# Altium PCB Solar.PcbDoc (part 1 of 2)
Units mm, origin at the board's own origin, x right, y up, seen from the top; angles counter-clockwise.
Board outline 89.66 x 101.6 mm, 2 copper layers (Top Layer, Bottom Layer); 143 components, 89 nets, 454 pads, 227 vias.
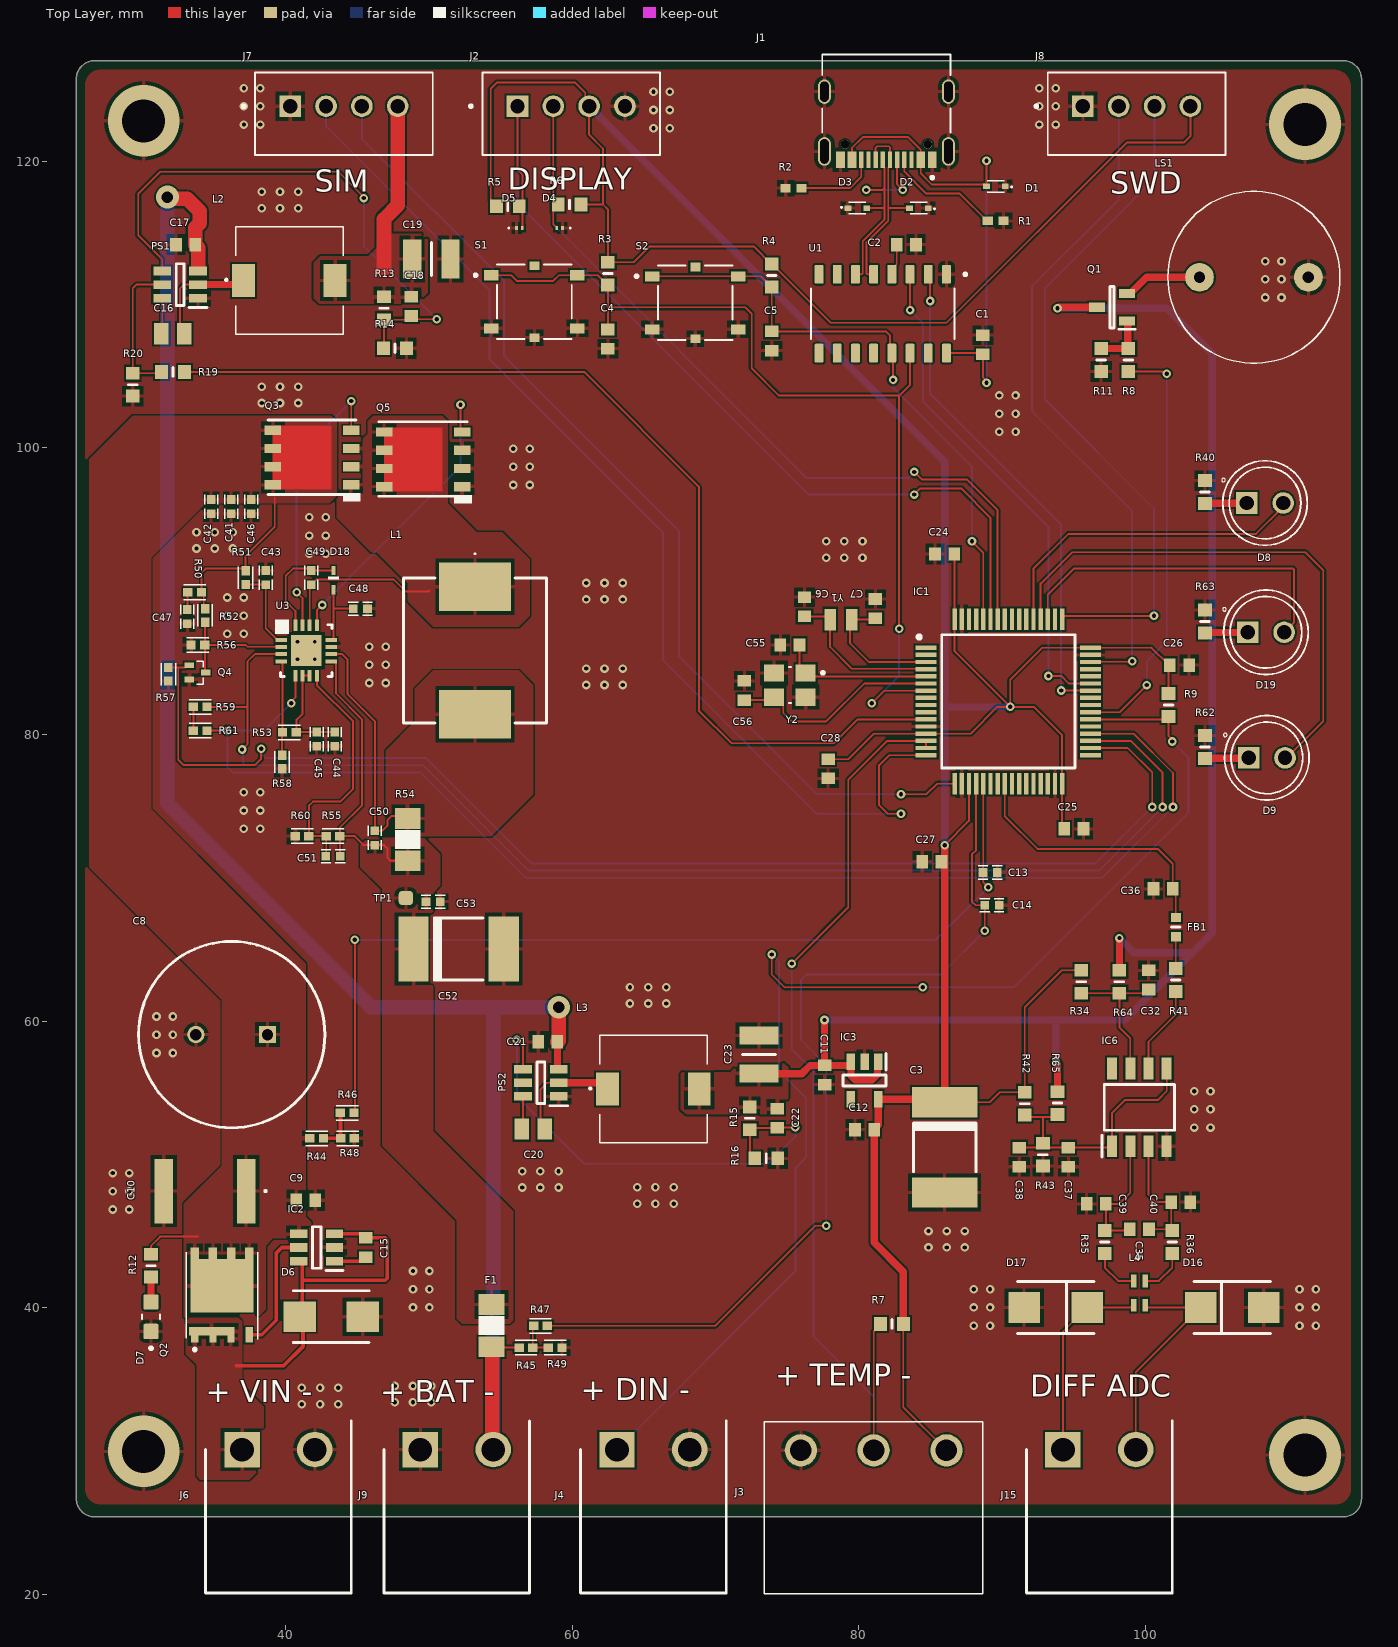
[diagram p0: Top Layer view]
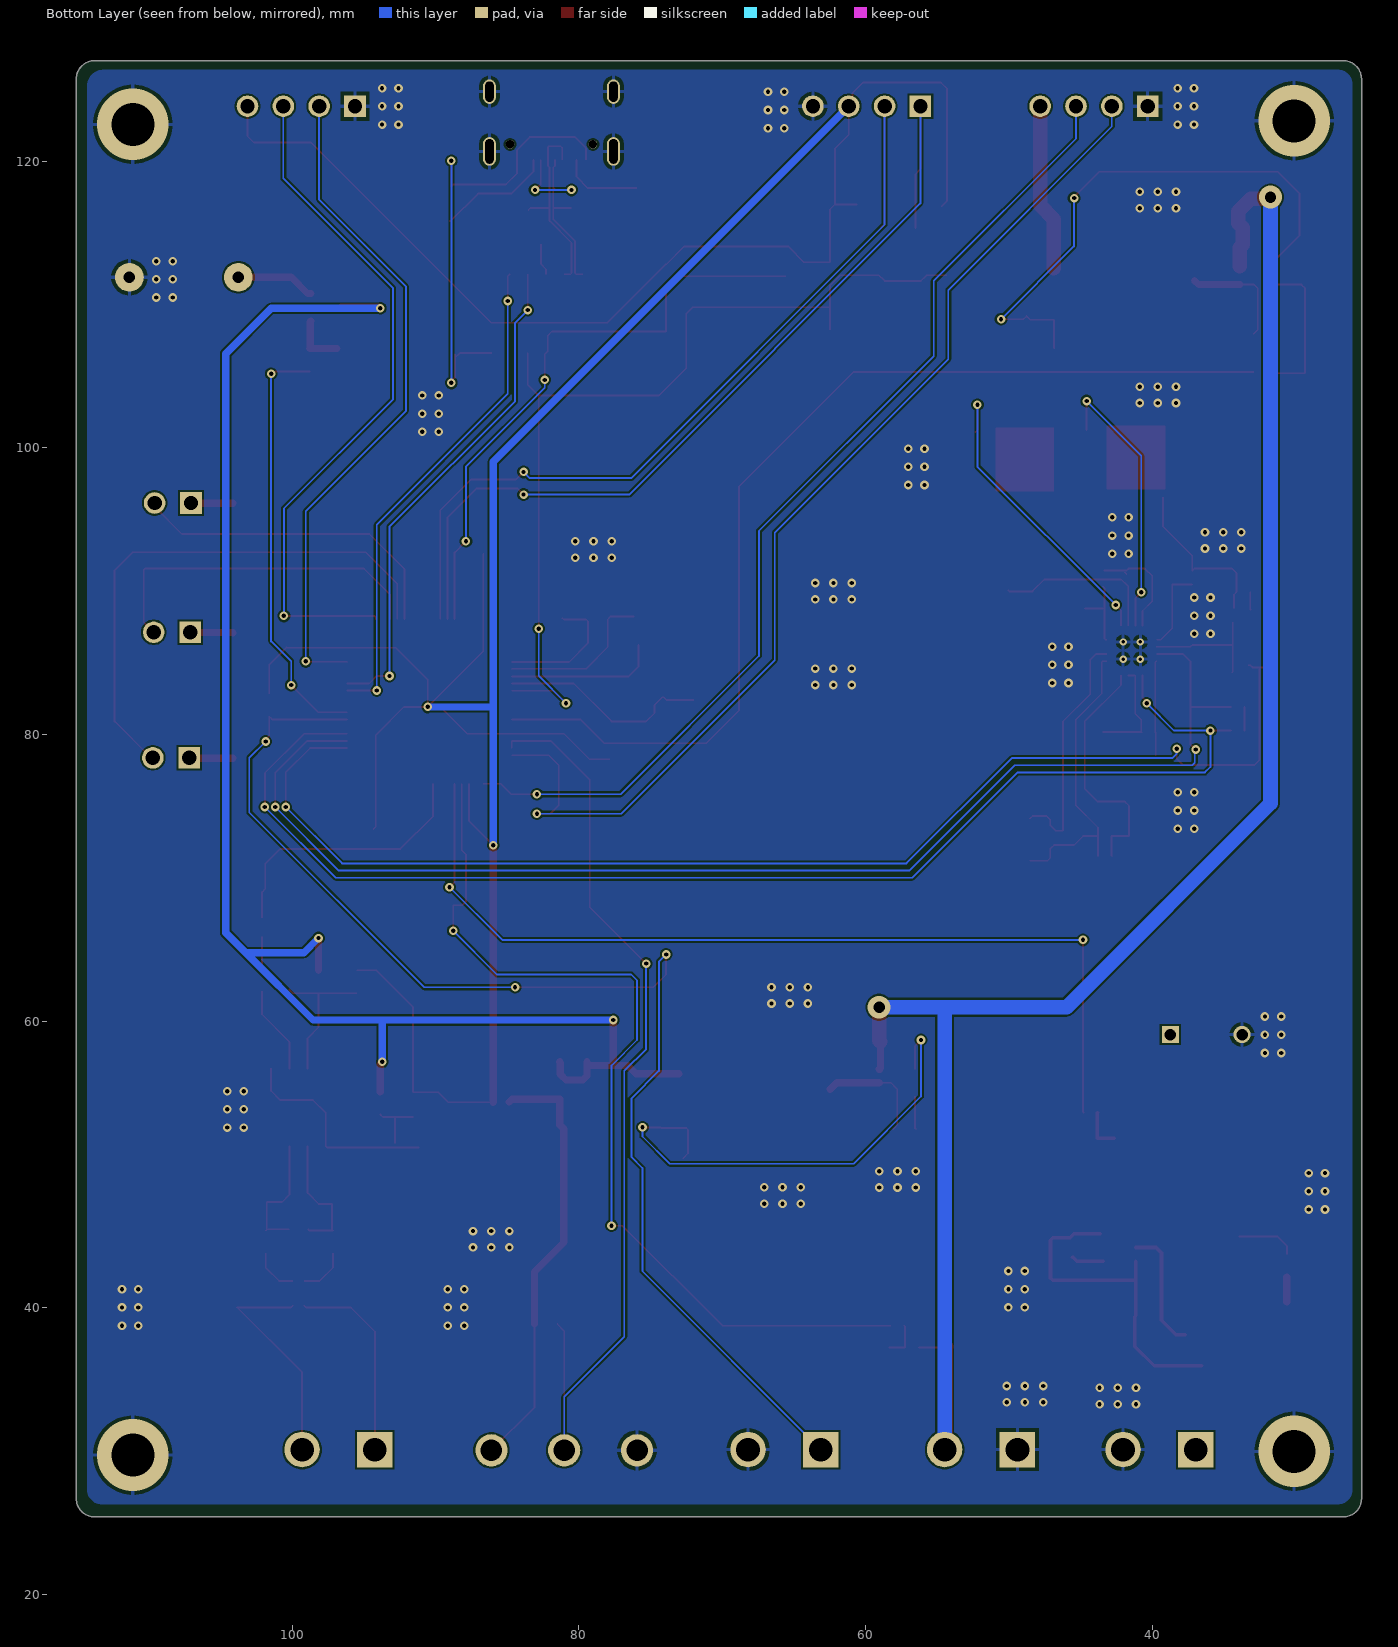
[diagram p1: Bottom Layer view, seen from below]
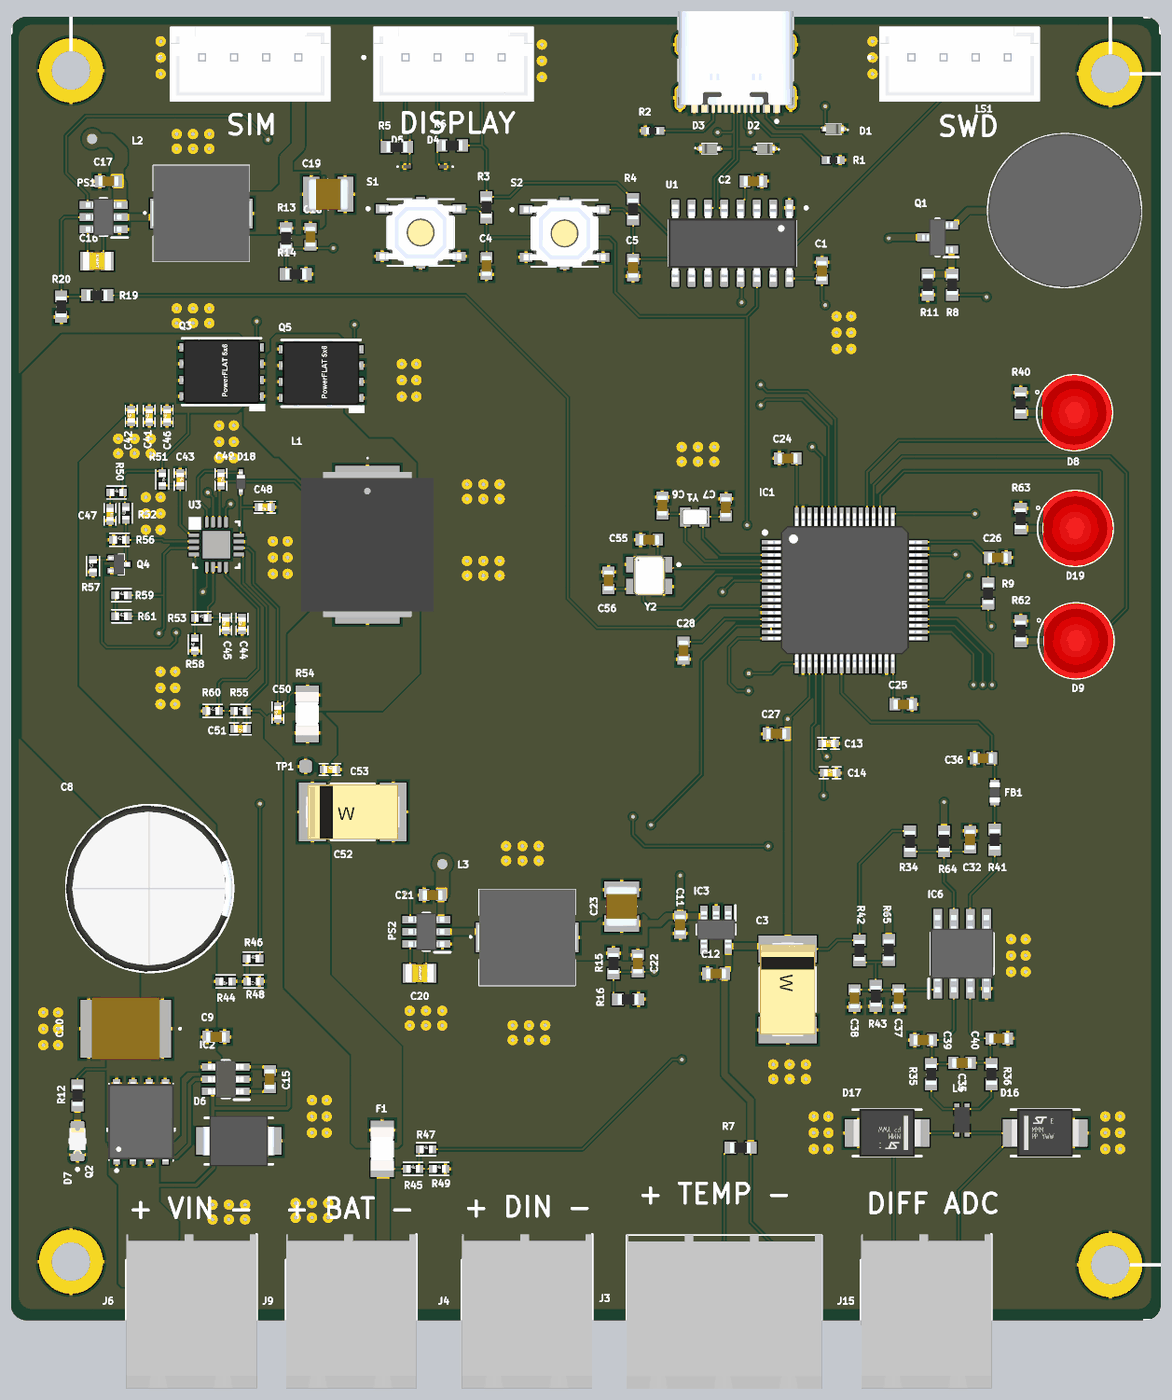
[diagram p3: 3D render of the assembled board from above, using the file's embedded part models]

## Layer stack, top to bottom
Top Solder: solder mask 0.0102, Solder Resist, Dk 3.5
Top Layer: signal copper 0.0356
Dielectric 1: dielectric 0.32, FR-4, Dk 4.8
Bottom Layer: signal copper 0.0356
Bottom Solder: solder mask 0.0102, Solder Resist, Dk 3.5

## Board outline
25.4,26.67 25.4,125.73 cw(c26.67,125.73) 26.67,127 113.792,127 cw(c113.792,125.73) 115.062,125.73 115.062,26.67 cw(c113.792,26.67) 113.792,25.4 26.67,25.4 cw(c26.67,26.67)

## Design rules (kind name [scope] priority, off if disabled: settings)
Clearance [All] p1: gap=0.127 ignorepadtopadclearanceinfootprint=TRUE
DiffPairsRouting [All] p1: maxlimit=0.127 minlimit=0.127 mostfreqgap=0.127 toplayer_minwidth=0.127 toplayer_maxwidth=0.279 toplayer_prefwidth=0.127 bottomlayer_minwidth=0.127 bottomlayer_maxwidth=0.279 bottomlayer_prefwidth=0.127 maxuncoupledlength=12.7
HoleSize [All] p1: absolutevalues=TRUE maxlimit=6 minlimit=0.025 maxpercent=80.000 minpercent=20.000
PolygonConnect [All] p1: connectstyle=Relief reliefconductorwidth=0.254 reliefentries=4 polygonreliefangle="90 Angle" airgapwidth=0.254
RoutingVias [All] p1: holewidth=0.3 width=0.6 viastyle="Through Hole" minholewidth=0.3 minwidth=0.6 maxholewidth=6 maxwidth=12
SilkToSolderMaskClearance [IsPad] p1: minsilkscreentomaskgap=0.127 clearancetoexposedcopper=TRUE
SolderMaskExpansion [All] p1: expansion=0.102 istentingtop=FALSE
Width [All] p1: maxlimit=2.54 minlimit=0.127 preferedwidth=0.254
27 further rules are at their usual default settings.

## Classes and differential pairs
component class PWR: C8 C9 C10 C11 C12 C15 C16 C17 C18 C19 C20 C21 C22 C23 D6 D7 IC2 IC3 J6 L2 L3 PS1 PS2 Q2 R12 R13 R14 R15 R16 R19 R20
component class programmer: C1 C2 D1 D2 D3 J1 R1 R2 U1
component class MCU: C3 C4 C5 C6 C7 C24 C25 C26 C27 C28 C55 C56 D4 D5 D8 D9 D19 IC1 J2 J3 J4 J8 LS1 Q1 R3 R4 R5 R6 R7 R8 R9 R11 R40 R62 R63 S1 S2 Y1 Y2
component class GSM: J7
component class Charger: C41 C42 C43 C44 C45 C46 C47 C48 C49 C50 C51 C52 C53 D18 F1 J9 L1 Q3 Q4 Q5 R50 R51 R52 R53 R54 R55 R56 R57 R58 R59 R60 R61 TP1 U3
component class ADC: C13 C14 C32 C35 C36 C37 C38 C39 C40 D16 D17 FB1 IC6 J15 L4 R34 R35 R36 R41 R42 R43 R44 R45 R46 R47 R48 R49 R64 R65
differential pair USB: +USB_P -USB_N

## Components (designator, comment, footprint, x,y, rotation, side; value= is the part's Value field where it differs from the comment)
C1 "0.1 uF" CAP0603 88.646,107.188 r270 top
C2 "0.1 uF" CAP0603 83.312,114.173 r180 top
C3 "Capacitor Tantalum" EIA-7343-31 85.979,51.181 r270 top value=47uF
C4 "0.1 uF" CAP0603 62.489,107.579 r270 top
C5 "0.1 uF" CAP0603 73.919,107.442 r270 top
C6 "1.5 pF" CAP0603 76.2,88.9 r270 top
C7 "1.5 pF" CAP0603 81.153,88.773 r270 top
C8 "MAL213651471E3" CAPPRD500W60D1300H2700 38.735,59.055 r180 top
C9 "2.2 uF" CAP0603 41.402,47.498 r180 top
C10 "C5750X5R1H106K230KA" C5750_Commercial 34.371,48.133 r180 top
C11 "2.2 uF" CAP0603 77.597,56.231 r270 top
C12 "2.2 uF" CAP0603 80.391,52.421 r180 top
C13 "Capacitor ceramic" C0402 89.154,70.358 r0 top value=100nF
C14 "Capacitor ceramic" C0402 89.281,68.072 r0 top value=100nF
C15 "0.1 uF" CAP0603 45.593,44.196 r270 top
C16 "C0805C104M5RAC-TU" CAPC2012X88N 32.131,107.95 r180 top
C17 "C5750X5R1H106K230KA" CAP0603 33.02,114.173 r0 top
C18 "GRM0335C1E560JA01D" CAP0603 48.768,109.855 r90 top
C19 "GRM32ER61C476KE15L" CAPC3225X270N 50.165,113.157 r180 top
C20 "C0805C104M5RAC-TU" CAPC2012X88N 57.277,52.451 r180 top
C21 "C5750X5R1H106K230KA" CAP0603 58.293,58.547 r0 top
C22 "CGA1A2C0G1E820J030BA" CAP0603 74.295,53.213 r90 top
C23 "GRM32ER61C476KE15L" CAPC3225X270N 73.025,57.658 r270 top
C24 "0.1 uF" CAP0603 85.979,92.583 r180 top
C25 "0.1 uF" CAP0603 94.996,73.406 r0 top
C26 "0.1 uF" CAP0603 102.362,84.836 r0 top
C27 "0.1 uF" CAP0603 85.09,71.12 r180 top
C28 "0.1 uF" CAP0603 77.851,77.597 r270 top
C32 "0.1 uF" CAP0603 100.203,62.865 r90 top
C35 "0.1 uF" CAP0603 99.568,45.466 r0 top
C36 "10 nF" CAP0603 101.219,69.215 r180 top
C37 "10 uF" CAP0603 94.615,50.498 r270 top
C38 "0.1 uF" CAP0603 91.186,50.498 r270 top
C39 "0.1 uF" CAP0603 96.555,47.244 r0 top
C40 "0.1 uF" CAP0603 102.454,47.371 r0 top
C41 "Capacitor ceramic" C0402 36.195,95.885 r90 top value=100nF
C42 "Capacitor ceramic" C0402 34.798,95.885 r90 top value=100nF
C43 "Capacitor ceramic" C0402 38.608,90.932 r270 top value=100nF
C44 "Capacitor ceramic" C0402 43.434,79.666 r90 top value=100nF
C45 "Capacitor ceramic" C0402 42.164,79.666 r90 top value=100nF
C46 "Capacitor ceramic" C0402 37.592,95.885 r90 top value=100nF
C47 "Capacitor ceramic" C0402 33.147,88.212 r270 top value=100nF
C48 "Capacitor ceramic" C0402 45.212,88.773 r180 top value=100nF
C49 "Capacitor ceramic" C0402 41.783,90.932 r270 top value=100nF
C50 "Capacitor ceramic" C0402 46.228,72.771 r90 top value=100nF
C51 "Capacitor ceramic" C0402 43.307,71.501 r180 top value=100nF
C52 "Capacitor Tantalum" EIA-7343-31 52.07,65.024 r0 top value=47uF
C53 "Capacitor ceramic" C0402 50.292,68.326 r0 top value=100nF
C55 "1.5 pF" CAP0603 75.184,86.233 r0 top
C56 "1.5 pF" CAP0603 72.009,83.058 r270 top
D1 "LESD5D5.0CT1G" LESD5D50CT1G 89.546,118.237 r180 top
D2 "LESD5D5.0CT1G" LESD5D50CT1G 84.176,116.713 r180 top
D3 "LESD5D5.0CT1G" LESD5D50CT1G 79.883,116.713 r0 top
D4 "DESD3V3Z1BCSF-7" DESD3V3Z1BCSF7 59.109,115.316 r180 top
D5 "DESD3V3Z1BCSF-7" DESD3V3Z1BCSF7 56.315,115.316 r0 top
D6 "SMBJ24CA-13-F" DIONM5336X250N 43.18,39.37 r0 top
D7 "LED_SMD" LEDSC125X200X90-2N 30.607,39.37 r90 top
D8 "WP7113ID" LED_WP7113ID 108.331,96.139 r0 top
D9 "WP7113ID" LED_WP7113ID 108.458,78.359 r0 top
D16 "SMBJ5.0A" SMBJ12A 106.045,40.005 r0 top
D17 "SMBJ5.0A" SMBJ12A 93.726,40.005 r180 top
D18 "BAT54KFILM" SOD-523 43.339,90.755 r90 top
D19 "WP7113ID" LED_WP7113ID 108.394,87.122 r0 top
F1 "10A, 24V" F1206 54.356,38.735 r270 top value=1206SFH100F/24-2
FB1 "BLM18PG121SN1D" BLM18SP221SN1B 102.108,66.548 r90 top
IC1 "STM32F103RET6" QFP50P1200X1200X160-64N 90.424,82.296 r0 top
IC2 "LM74700QDBVTQ1" SOT95P280X145-6N 42.164,44.196 r180 top
IC3 "AP2112K-1.2TRG1" SOT95P285X140-5N 80.391,55.85 r270 top
IC6 "INA149AID" SOIC127P600X175-8N 99.568,53.975 r90 top
J1 "TYPE-C-31-M-12" HRO_TYPE-C-31-M-12 81.915,124.841 r180 top
J2 "DISPLAY" JST_B4B-XH-A(LF)(SN) 59.924,123.3 r180 top
J3 "DS18B20/PT100" 2828153 75.946,30.049 r0 top
J4 "Digital" SHDRRA2W102P0X508_1X2_1016X1200X850P 63.119,30.099 r180 top
J6 "282815-2" SHDRRA2W102P0X508_1X2_1016X1200X850P 36.957,30.099 r180 top
J7 "EX_SIM" JST_B4B-XH-A(LF)(SN) 44.069,123.3 r180 top
J8 "DISPLAY" JST_B4B-XH-A(LF)(SN) 99.374,123.3 r180 top
J9 "282815-2" SHDRRA2W102P0X508_1X2_1016X1200X850P 49.403,30.099 r180 top
J15 "282815-2" SHDRRA2W102P0X508_1X2_1016X1200X850P 94.234,30.099 r180 top
L1 "SRP1038WA-6R8M" SRP1038WA6R8M 53.213,85.852 r270 top
L2 "PA4302.103NLT" PA4302103NLT 40.259,111.658 r90 top
L3 "PA4302.103NLT" PA4302103NLT 65.659,55.245 r90 top
L4 "744231091" WE-CNSW_08058 99.568,41.021 r0 top
LS1 "CMI-1295IC-0585T" CMI1295IC0585T 103.759,111.887 r0 top
PS1 "TPS54202DDCR" SOT95P280X110-6N 32.639,111.379 r180 top
PS2 "TPS54202DDCR" SOT95P280X110-6N 57.805,55.687 r180 top
Q1 "DMG3415U-7" SOT96P240X110-3N 97.655,109.799 r180 top
Q2 "BSC014N06NSATMA1" BSC010N04LS6ATMA1 35.56,40.879 r0 top
Q3 "STL150N3LLH5" "PowerFLAT 5x6" 44.566,97.409 r90 top
Q4 "DMG1012T" SOT-523_custom 33.849,84.32 r270 top value=DMG1012T-7
Q5 "STL150N3LLH5" "PowerFLAT 5x6" 52.324,97.282 r90 top
R1 "CRCW0402100KFKEDHP" RESC1005X40N 89.535,115.824 r0 top
R2 "CRCW0402100KFKEDHP" RESC1005X40N 75.438,118.11 r0 top
R3 "10K" RES0603 62.484,112.141 r90 top
R4 "10K" RES0603 73.914,112.004 r90 top
R5 "4.7K" RES0603 55.499,116.84 r180 top
R6 "4.7K" RES0603 59.817,116.967 r0 top
R7 "4.7K" RES0603 82.296,38.862 r0 top
R8 "300R" RES0603 98.798,106.116 r270 top
R9 "4.7K" RES0603 101.6,82.042 r90 top
R11 "10K" RES0603 96.893,106.116 r270 top
R12 "1K" RES0603 30.607,42.926 r270 top
R13 "CRCW0402100KFKEDHP" RES0603 46.863,109.728 r90 top
R14 "CRCW040216K9FKEDHP" RES0603 47.625,106.934 r180 top
R15 "CRCW0402100KFKEDHP" RES0603 72.39,53.213 r90 top
R16 "CRCW040213K7FKEDHP" RES0603 73.533,50.419 r180 top
R19 "300R" RES0603 32.131,105.283 r0 top
R20 "10K" RES0603 29.337,104.394 r270 top
R34 "00" RES0603 95.504,62.738 r90 top
R35 "100R" RES0603 97.155,44.577 r90 top
R36 "100R" RES0603 101.854,44.577 r90 top
R40 "300R" RES0603 104.14,96.901 r270 top
R41 "10K" RES0603 102.108,62.865 r90 top
R42 "10K" RES0603 91.567,54.229 r90 top
R43 "10K" RES0603 92.837,50.673 r90 top
R44 "Resistor" R0402 42.164,51.816 r180 top value=100K
R45 "Resistor" R0402 56.769,37.211 r0 top value=100K
R46 "Resistor" R0402 44.29,53.594 r0 top value=1K
R47 "Resistor" R0402 57.785,38.735 r0 top value=1K
R48 "Resistor" R0402 44.323,51.816 r180 top value=12K
R49 "Resistor" R0402 58.801,37.211 r0 top value=24.9K
R50 "Resistor" R0402 33.655,89.916 r0 top value=100K
R51 "Resistor" R0402 37.211,90.932 r270 top value=100K
R52 "Resistor" R0402 34.38,88.298 r90 top value=150K
R53 "Resistor" R0402 40.259,80.137 r0 top value=100K
R54 "Resistor" F1206 48.514,72.644 r270 top value=100K
R55 "Resistor" R0402 43.307,72.898 r0 top value=560K
R56 "Resistor" R0402 33.876,86.233 r0 top value=11K
R57 "Resistor" R0402 31.817,84.193 r90 top value=10K
R58 "Resistor" R0402 39.751,78.072 r90 top value=100K
R59 "Resistor" R0402 34.036,81.915 r0 top value=100K
R60 "Resistor" R0402 41.148,72.898 r0 top value=110K
R61 "Resistor" R0402 34.036,80.264 r0 top value=100K
R62 "300R" RES0603 104.14,79.121 r270 top
R63 "300R" RES0603 104.14,87.884 r270 top
R64 "00" RES0603 98.171,62.738 r90 top
R65 "10K" RES0603 93.853,54.267 r90 top
S1 "PTS526_SMG15_SMTR2_LFS" SW_PTS526_SMG15_SMTR2_LFS 57.356,110.181 r0 top
S2 "PTS526_SMG15_SMTR2_LFS" SW_PTS526_SMG15_SMTR2_LFS 68.58,110.109 r0 top
TP1 "Test_Point" TEST_POINT 48.387,68.58 r90 top
U1 "CH340C" SOIC127P600X180-16N 81.661,109.347 r270 top
U3 "BQ24650" QFN-16_custom 41.43,85.848 r0 top value=BQ24650RVAT
Y1 "CM8V-T1A-32.768KHZ-6PF-20PPM-TA-QC" XTAL_CM8V-T1A-32.768KHZ-6PF-20PPM-TA-QC 78.74,88.011 r180 top
Y2 "C3E-25.000-8-1530-X-R" XTAL_C3E-25.000-8-1530-X-R 75.184,83.439 r180 top

## Footprints (in the part's own frame and the unit in brackets; to place one, negate y for a bottom-side part, rotate by r counter-clockwise, add the part's x,y. Pads: shape width x height; smd on the part's side, far side on the other; paste and mask are expansions set on the pad)
2828153 [mm]
  round 2.25 hole 1.5: 1(0,0) 2(5.08,0) 3(10.16,0)
  silkscreen extent -2.54,-10 12.7,2, body extent -2.54,-10 12.7,2, height 8.46
BLM18SP221SN1B [mm]
  rect 0.65x0.7 smd: 1(-0.675,0) 2(0.675,0)
  silkscreen extent 0,-0.3 0,0.3, body extent -0.8,-0.4 0.8,0.4, height 0.8
BSC010N04LS6ATMA1 [mm]
  rect 0.5x0.5 smd: 1(-1.905,-3.075) 2(-0.635,-3.075) 3(0.635,-3.075)
  rect 0.5x1.1 smd: 4(1.905,-2.775)
  rect 0.6x0.8 smd: 5(1.905,2.925) 6(0.635,2.925) 7(-0.635,2.925) 8(-1.905,2.925)
  rect 4.41x3.75 smd: 9(0,0.65)
  rect 3.2x0.6 smd: 10(-0.715,-2.525)
  silkscreen extent -2.5,-3.9 2.5,3, body extent -2.7,-3.08 2.7,3.08, height 1.1
C0402 [mm]
  rect 0.6x0.6 smd: 1(-0.5,0) 2(0.5,0)
  silkscreen extent -0.84,-0.46 0.84,0.46, body extent -0.5,-0.3 0.5,0.3, height 0.2
C5750_Commercial [mm]
  rect 1.3x4.5 smd: 1(-2.875,0) 2(2.875,0)
  silkscreen extent -4.28,-0.05 -4.18,0.05, body extent -2.65,-2.45 2.65,2.45, height 2.77
CAP0603 [mm]
  rect 0.81x0.94 smd: 1(-0.67,0) 2(0.67,0)
  body extent -0.8,-0.4 0.8,0.4, height 0.9
CAPC2012X88N [mm]
  rect 1.02x1.47 smd: 1(-0.8,0) 2(0.8,0)
  body extent -1.1,-0.73 1.1,0.72, height 0.88
CAPC3225X270N [mm]
  rect 1.26x2.72 smd: 1(-1.33,0) 2(1.33,0)
  silkscreen extent 0,-1.15 0,1.15, body extent -1.6,-1.25 1.6,1.25, height 2.7
CAPPRD500W60D1300H2700 [mm]
  rect 1.2x1.2 hole 0.8: 1(0,0)
  round 1.2 hole 0.8: 2(5,0)
  silkscreen extent -4,-6.5 9,6.5, body extent -3.96,-6.49 9.03,6.49, height 25
CMI1295IC0585T [mm]
  round 2 hole 0.8: 1(0,0) 2(7.6,0)
  silkscreen extent -2.2,-6 9.8,6, body extent -2.19,-5.99 9.81,6, height 9.63
DESD3V3Z1BCSF7 [mm]
  rect 0.194x0.291 smd: 1(-0.2,0) 2(0.2,0)
  silkscreen extent -0.8,-0.05 -0.7,0.05, body extent -0.3,-0.15 0.3,0.15, height 0.42
DIONM5336X250N [mm]
  rect 2.25x2.15 smd: 1(-2.2,0) 2(2.2,0)
  silkscreen extent -2.65,-1.81 2.65,1.81, body extent -2.8,-1.97 2.8,1.97, height 2.57
EIA-7343-31 [mm]
  rect 2.1x4.55 smd: 1(-3.15,0) 2(3.15,0)
  silkscreen extent -1.7,-2.18 1.7,2.17, body extent -3.65,-2.16 3.65,2.14, height 2.3
F1206 [mm]
  rect 1.45x1.8 smd: 1(-1.488,0.005) 2(1.462,0.005)
  silkscreen extent -0.67,-0.9 0.65,0.91, body extent -1.73,-0.9 1.67,0.9, height 1.17
HRO_TYPE-C-31-M-12 [mm]
  rect 0.6x1.14 smd mask+0.05: A1_B12(-3.2,4.75) A4_B9(-2.4,4.75) B1_A12(3.2,4.75) B4_A9(2.4,4.75)
  rect 0.3x1.14 smd mask+0.05: A5(-1.25,4.75) A6(-0.25,4.75) A7(0.25,4.75) A8(1.25,4.75) B5(1.75,4.75) B6(0.75,4.75) B7(-0.75,4.75) B8(-1.75,4.75)
  oval 0.9x2 hole 0.6 slot 1.7 at 90 deg: S1(-4.325,4.17) S2(4.325,4.17)
  oval 0.9x1.7 hole 0.6 slot 1.4 at 90 deg: S3(-4.325,0) S4(4.325,0)
  round 0.6 hole 0.6 unplated: ""(-2.89,3.68) ""(2.89,3.68)
  silkscreen extent -4.47,-2.6 4.47,6.1, body extent -4.47,-2.6 4.47,5.31, height 3.31
JST_B4B-XH-A(LF)(SN) [mm]
  rect 1.508x1.508 / inner round 1.508 / far side rect 1.508x1.508 hole 1: 1(3.75,-0.525)
  round 1.508 hole 1: 2(1.25,-0.525) 3(-1.25,-0.525) 4(-3.75,-0.525)
  silkscreen extent -6.2,-2.88 7.1,2.88, body extent -6.2,-2.88 6.2,2.88, height 7
LED_WP7113ID [mm]
  round 1.508 hole 1: A(1.27,0)
  rect 1.508x1.508 / inner round 1.508 / far side rect 1.508x1.508 hole 1: C(-1.27,0)
  silkscreen extent -3.03,-2.95 2.95,2.95, body extent -2.5,-2.95 2.95,2.95, height 9.6
LEDSC125X200X90-2N [mm]
  rrect25% 1.07x1.08 smd: A(1.025,0) C(-1.025,0)
  silkscreen extent -2.3,-0.63 0.17,0.63, body extent -1,-0.63 1,0.63, height 0.7
LESD5D50CT1G [mm]
  rect 0.48x0.4 smd: 1(-0.66,0) 2(0.66,0)
  silkscreen extent -1.15,-0.4 0.6,0.4, body extent -0.8,-0.4 0.8,0.4, height 0.6
PA4302103NLT [mm]
  rect 2.3x1.6 smd: 1(0,3.2) 2(0,-3.2)
  silkscreen extent -3.75,-3.75 3.75,4.45, body extent -3.75,-3.84 3.75,3.84, height 5.7
"PowerFLAT 5x6" [mm]
  rect 0.65x1.15 smd: 1(0,0) 2(1.27,0) 3(2.54,0) 4(3.81,0) 5(3.81,5.45) 6(2.54,5.45) 7(1.27,5.45) 8(0,5.45)
  Top Layer region: -0.325,1.375 4.135,1.375 4.135,5.475 -0.325,5.475
  silkscreen extent -1.17,-0.67 4.53,5.8, body extent -0.67,-0.35 4.53,5.8, height 0.95
QFN-16_custom [mm]
  rect 0.8x0.28 smd: 1(-1.75,0.75) 2(-1.75,0.25) 3(-1.75,-0.25) 4(-1.75,-0.75) 9(1.75,-0.75) 10(1.75,-0.25) 11(1.75,0.25) 12(1.75,0.75)
  rect 0.28x0.8 smd: 5(-0.75,-1.75) 6(-0.25,-1.75) 7(0.25,-1.75) 8(0.75,-1.75) 13(0.75,1.75) 14(0.25,1.75) 15(-0.25,1.75) 16(-0.75,1.75)
  rect 2.14x2.14 smd: 17(0,0)
  silkscreen extent -2.16,-1.8 1.8,2.15, body extent -1.8,-1.8 1.8,1.8, height 1
QFP50P1200X1200X160-64N [mm]
  rect 1.475x0.3 smd: 1(-5.738,3.75) 2(-5.738,3.25) 3(-5.738,2.75) 4(-5.738,2.25) 5(-5.738,1.75) 6(-5.738,1.25) 7(-5.738,0.75) 8(-5.738,0.25) 9(-5.738,-0.25) 10(-5.738,-0.75) 11(-5.738,-1.25) 12(-5.738,-1.75) 13(-5.738,-2.25) 14(-5.738,-2.75) 15(-5.738,-3.25) 16(-5.738,-3.75) 33(5.738,-3.75) 34(5.738,-3.25) 35(5.738,-2.75) 36(5.738,-2.25) 37(5.738,-1.75) 38(5.738,-1.25) 39(5.738,-0.75) 40(5.738,-0.25) 41(5.738,0.25) 42(5.738,0.75) 43(5.738,1.25) 44(5.738,1.75) 45(5.738,2.25) 46(5.738,2.75) 47(5.738,3.25) 48(5.738,3.75)
  rect 0.3x1.475 smd: 17(-3.75,-5.738) 18(-3.25,-5.738) 19(-2.75,-5.738) 20(-2.25,-5.738) 21(-1.75,-5.738) 22(-1.25,-5.738) 23(-0.75,-5.738) 24(-0.25,-5.738) 25(0.25,-5.738) 26(0.75,-5.738) 27(1.25,-5.738) 28(1.75,-5.738) 29(2.25,-5.738) 30(2.75,-5.738) 31(3.25,-5.738) 32(3.75,-5.738) 49(3.75,5.738) 50(3.25,5.738) 51(2.75,5.738) 52(2.25,5.738) 53(1.75,5.738) 54(1.25,5.738) 55(0.75,5.738) 56(0.25,5.738) 57(-0.25,5.738) 58(-0.75,5.738) 59(-1.25,5.738) 60(-1.75,5.738) 61(-2.25,5.738) 62(-2.75,5.738) 63(-3.25,5.738) 64(-3.75,5.738)
  silkscreen extent -6.35,-4.65 4.65,4.65, body extent -6,-6 6,6, height 1.6
R0402 [mm]
  rect 0.65x0.6 smd: 1(-0.475,0) 2(0.475,0)
  silkscreen extent -0.76,-0.51 0.76,0.51, body extent -0.5,-0.3 0.5,0.3, height 0.2
RES0603 [mm]
  rect 0.9x0.95 smd: 1(-0.8,0) 2(0.8,0)
  silkscreen extent 0,-0.3 0,0.3, body extent -0.8,-0.4 0.8,0.4, height 0.55
RESC1005X40N [mm]
  rect 0.7x0.6 smd: 1(-0.55,0) 2(0.55,0)
  body extent -0.5,-0.25 0.5,0.25, height 0.4
SHDRRA2W102P0X508_1X2_1016X1200X850P [mm]
  rect 2.475x2.475 hole 1.65: 1(0,0)
  round 2.475 hole 1.65: 2(-5.08,0)
  silkscreen extent -7.62,-2 2.54,10, body extent -7.62,-2 2.54,10, height 8.35
SMBJ12A [mm]
  rect 2.2x2.15 smd: 1(-2.2,0) 2(2.2,0)
  silkscreen extent -2.68,-1.81 2.68,1.81, body extent -2.68,-1.86 2.68,1.86, height 2.33
SOD-523 [mm]
  rect 0.65x0.3 smd: 1(-0.675,0) 2(0.675,0)
  silkscreen extent 0.05,-0.4 0.24,0.4, body extent -0.8,-0.4 0.8,0.4, height 0.7
SOIC127P600X175-8N [mm]
  rect 1.525x0.7 smd: 1(-2.712,1.905) 2(-2.712,0.635) 3(-2.712,-0.635) 4(-2.712,-1.905) 5(2.712,-1.905) 6(2.712,-0.635) 7(2.712,0.635) 8(2.712,1.905)
  silkscreen extent -3.47,-2.45 1.6,2.61, body extent -3,-2.45 3,2.45, height 1.75
SOIC127P600X180-16N [mm]
  rrect25% 1.31x0.62 smd: 1(-2.75,4.445) 2(-2.75,3.175) 3(-2.75,1.905) 4(-2.75,0.635) 5(-2.75,-0.635) 6(-2.75,-1.905) 7(-2.75,-3.175) 8(-2.75,-4.445) 9(2.75,-4.445) 10(2.75,-3.175) 11(2.75,-1.905) 12(2.75,-0.635) 13(2.75,0.635) 14(2.75,1.905) 15(2.75,3.175) 16(2.75,4.445)
  silkscreen extent -2.85,-5 1.78,5.85, body extent -3,-5 3,5, height 1.8
SOT95P280X110-6N [mm]
  rect 1.25x0.6 smd: 1(-1.25,0.95) 2(-1.25,0) 3(-1.25,-0.95) 4(1.25,-0.95) 5(1.25,0) 6(1.25,0.95)
  silkscreen extent -1.88,-1.45 0.28,1.6, body extent -1.4,-1.45 1.4,1.45, height 1.1
SOT95P280X145-6N [mm]
  rect 1.2x0.6 smd: 1(-1.25,0.95) 2(-1.25,0) 3(-1.25,-0.95) 4(1.25,-0.95) 5(1.25,0) 6(1.25,0.95)
  silkscreen extent -1.85,-1.45 0.3,1.6, body extent -1.4,-1.45 1.4,1.45, height 1.2
SOT95P285X140-5N [mm]
  rect 1.15x0.6 smd: 1(-1.3,0.95) 2(-1.3,0) 3(-1.3,-0.95) 4(1.3,-0.95) 5(1.3,0.95)
  silkscreen extent -1.88,-1.5 0.38,1.5, body extent -1.43,-1.5 1.43,1.5, height 1.4
SOT96P240X110-3N [mm]
  rect 1.1x0.65 smd: 1(-1.05,0.96) 2(-1.05,-0.96) 3(1.05,0)
  silkscreen extent -1.6,-1.45 0.15,1.54, body extent -1.2,-1.45 1.2,1.45, height 1.1
SOT-523_custom [mm]
  rect 0.4x0.65 smd: 1(-0.5,-0.575) 2(0,0.575) 3(0.5,-0.575)
  silkscreen extent -0.79,-0.06 0.81,0.41, body extent -0.79,-0.81 0.81,0.79, height 0.8
SRP1038WA6R8M [mm]
  rect 3.4x5 smd: 1(-4.45,0) 2(4.45,0)
  silkscreen extent -6.8,-5 5.05,5, body extent -5.65,-5.16 5.65,5.16, height 4.02
SW_PTS526_SMG15_SMTR2_LFS [mm]
  rect 1x0.7 smd: 1(-3,1.85) 2(3,1.85) 3(-3,-1.85) 4(3,-1.85)
  rect 0.7x0.6 smd: G1(0,2.5) G2(0,-2.5)
  silkscreen extent -4.2,-2.6 2.6,2.6, body extent -3.2,-2.6 3.2,2.6, height 1.7
TEST_POINT [mm]
  rrect50% 1x1 smd: 0(0,0)
WE-CNSW_08058 [mm]
  rect 0.4x0.9 smd: 1(-0.4,-0.85) 2(-0.4,0.85) 3(0.4,0.85) 4(0.4,-0.85)
  body extent -0.6,-1 0.6,1, height 1.2
XTAL_C3E-25.000-8-1530-X-R [mm]
  rect 1.4x1.2 smd: 1(-1.1,-0.85) 2(1.1,-0.85) 3(1.1,0.85) 4(-1.1,0.85)
  silkscreen extent -2.4,-1.25 0.08,1.25, body extent -1.6,-1.25 1.6,1.25, height 0.75
XTAL_CM8V-T1A-32.768KHZ-6PF-20PPM-TA-QC [mm]
  rect 0.8x1.5 smd: 1(-0.75,0) 2(0.75,0)
  body extent -1,-0.6 1,0.6, height 0.6

## Part data
C1 C2 C4 C5 C6 C7 C9 C11 C12 C15 C24 C25 C26 C27 C28 C32 C35 C36 C37 C38 C39 C40 C55 C56: library part CC0603KRX7R9BB104, "Capacitor", Manufacturer_Name=YAGEO, Mouser Part Number=603-CC603KRX7R9BB104, Arrow Part Number=CC0603KRX7R9BB104, Arrow Price/Stock=https://www.arrow.com/en/products/cc0603krx7r9bb104/yageo?utm_currency=USD&region=europe, Datasheet Link=https://componentsearchengine.com/Datasheets/2/CC0603KRX7R9BB104.pdf, Height=0.9mm, Manufacturer_Part_Number=CC0603KRX7R9BB104, Mouser Price/Stock=https://www.mouser.co.uk/ProductDetail/YAGEO/CC0603KRX7R9BB104?qs=vTakOoo5QyLvVCYM2ge8LQ%3D%3D
C3 C52: library part "Cap Pol2", Manufacturer="AVX Corporation", Manufacturer Part No.=TAJD476K016RNJ, Supplier part number=478-1739-1-ND, Link=https://www.digikey.com/product-detail/en/avx-corporation/TAJD476K016RNJ/478-1739-1-ND/564771, Part Description="Capacitor Tantalum", Specification="TANT, 16V, 10%", Supplier=DigiKey
C8: "Capacitor Polarised", Manufacturer_Name=Vishay, Mouser Part Number=594-2222-136-51471, Datasheet Link=https://www.mouser.co.uk/datasheet/2/427/136rvi-1762300.pdf, Height=27mm, Manufacturer_Part_Number=MAL213651471E3, Mouser Price/Stock=https://www.mouser.co.uk/ProductDetail/Vishay-BC-Components/MAL213651471E3?qs=zGH8QOQ14qXx9%252BWDTpPwWA%3D%3D
C10 C17 C21: "Capacitor", Manufacturer_Name=TDK, Mouser Part Number=810-C5750X5R1H106K, Arrow Part Number=C5750X5R1H106K230KA, Arrow Price/Stock=https://www.arrow.com/en/products/c5750x5r1h106k230ka/tdk?region=nac, Datasheet Link=https://product.tdk.com/system/files/dam/doc/product/capacitor/ceramic/mlcc/catalog/mlcc_commercial_general_en.pdf, Height=2.5mm, Manufacturer_Part_Number=C5750X5R1H106K230KA, Mouser Price/Stock=https://www.mouser.co.uk/ProductDetail/TDK/C5750X5R1H106K230KA?qs=NRhsANhppD8lVYAvl0MZ3g%3D%3D
C13 C14 C41 C42 C43 C44 C45 C46 C47 C48 C49 C50 C51 C53: library part Cap, Manufacturer="TDK Corporation", Manufacturer Part No.=CGA2B3X7R1V104K050BB, Supplier part number=445-6901-1-ND, Link=https://www.digikey.com/product-detail/en/tdk-corporation/CGA2B3X7R1V104K050BB/445-6901-1-ND/2672919, Part Description="Ceramic Capacitor", Specification="X7R, 35V, 10%", Supplier=DigiKey
C16 C20: "Capacitor", Manufacturer_Name="Yageo Group", Arrow Part Number=C0805C104M5RAC-TU, Arrow Price/Stock=https://www.arrow.com/en/products/c0805c104m5ractu/kemet-corporation?region=nac, Datasheet Link=https://connect.kemet.com:7667/gateway/IntelliData-ComponentDocumentation/1.0/download/specsheet/C0805C104M5RACTU, Height=0.88mm, Manufacturer_Part_Number=C0805C104M5RAC-TU
C18: "Capacitor", Manufacturer_Name="Murata Electronics", Mouser Part Number=81-GRM0335C1E560JA1D, Arrow Part Number=GRM0335C1E560JA01D, Arrow Price/Stock=https://www.arrow.com/en/products/grm0335c1e560ja01d/murata-manufacturing, Height=0.33mm, Manufacturer_Part_Number=GRM0335C1E560JA01D, Mouser Price/Stock=https://www.mouser.com/Search/Refine.aspx?Keyword=81-GRM0335C1E560JA1D
C19 C23: "Capacitor", Manufacturer_Name="Murata Electronics", Mouser Part Number=81-GRM32ER61C476KE5L, Arrow Part Number=GRM32ER61C476KE15L, Arrow Price/Stock=https://www.arrow.com/en/products/grm32er61c476ke15l/murata-manufacturing?utm_currency=USD&region=europe, Datasheet Link=https://search.murata.co.jp/Ceramy/image/img/A01X/G101/ENG/GRM32ER61C476KE15-01A.pdf, Height=2.7mm, Manufacturer_Part_Number=GRM32ER61C476KE15L, Mouser Price/Stock=https://www.mouser.co.uk/ProductDetail/Murata-Electronics/GRM32ER61C476KE15L?qs=%252B%2F7tQhzlcy7Im%2F1Gh2YSGQ%3D%3D
C22: "Capacitor", Manufacturer_Name=TDK, Datasheet Link=https://product.tdk.com/system/files/dam/doc/product/capacitor/ceramic/mlcc/catalog/mlcc_automotive_general_en.pdf, Height=0.33mm, Manufacturer_Part_Number=CGA1A2C0G1E820J030BA
D1 D2 D3: "TVS Diode (Bi-directional)", Manufacturer_Name=LRC, Height=0.7mm, Manufacturer_Part_Number=LESD5D5.0CT1G
D4 D5: "TVS Diode (Bi-directional)", Manufacturer_Name="Diodes Incorporated", Mouser Part Number=621-DESD3V3Z1BCSF-7, Arrow Part Number=DESD3V3Z1BCSF-7, Arrow Price/Stock=https://www.arrow.com/en/products/desd3v3z1bcsf-7/diodes-incorporated?utm_currency=USD&region=nac, Datasheet Link=https://www.diodes.com/assets/Package-Files/X2-WLB0603-2.pdf, Height=0.32mm, Manufacturer_Part_Number=DESD3V3Z1BCSF-7, Mouser Price/Stock=https://www.mouser.co.uk/ProductDetail/Diodes-Incorporated/DESD3V3Z1BCSF-7?qs=HXFqYaX1Q2xS5VnKZuyjmg%3D%3D
D6: "TVS Diode (Bi-directional)", Manufacturer_Name="Diodes Incorporated", Mouser Part Number=621-SMBJ24CA-13-F, Arrow Part Number=SMBJ24CA-13-F, Arrow Price/Stock=https://www.arrow.com/en/products/smbj24ca-13-f/diodes-incorporated?utm_currency=USD&region=nac, Datasheet Link=https://www.diodes.com/assets/Datasheets/ds19002.pdf, Height=2.5mm, Manufacturer_Part_Number=SMBJ24CA-13-F, Mouser Price/Stock=https://www.mouser.co.uk/ProductDetail/Diodes-Incorporated/SMBJ24CA-13-F?qs=gaDBXWSqsDCkhBi9r6ReOQ%3D%3D
D7: library part 5990110007F, "Red 633nm LED Indication - Discrete 2.1V 0805 (2012 Metric)", Package="0805 Dialight", Availability="In Stock", Check_prices=https://www.snapeda.com/parts/599-0110-007F/Dialight/view-part/?ref=eda, MF=Dialight, MP=599-0110-007F, Price=None, Purchase-URL=https://pricing.snapeda.com/search/part/599-0110-007F/?ref=eda, SnapEDA_Link=https://www.snapeda.com/parts/599-0110-007F/Dialight/view-part/?ref=snap
D8 D9 D19: "Red 617nm LED Indication - Discrete 2V Radial", Package="Radial Kingbright", Availability="In Stock", Check_prices=https://www.snapeda.com/parts/WP7113ID/Kingbright/view-part/?ref=eda, MF=Kingbright, MP=WP7113ID, Price=None, Purchase-URL=https://pricing.snapeda.com/search/part/WP7113ID/?ref=eda, SnapEDA_Link=https://www.snapeda.com/parts/WP7113ID/Kingbright/view-part/?ref=snap
D16 D17: "TVS Diode (Uni-directional)", Manufacturer_Name=STMicroelectronics, Datasheet Link=https://www.st.com/resource/en/datasheet/smbj12a.pdf, Height=2.45mm, Manufacturer_Part_Number=SMBJ5.0A
D18: library part "D Schottky", "Schottky Diode", Manufacturer=STMicroelectronics, Supplier part number=497-5561-1-ND, Link=https://www.digikey.com/product-detail/en/stmicroelectronics/BAT54KFILM/497-5561-1-ND/1207053, Manufacturer Part No.=BAT54KFILM, Part Description="Small signal Schottky diode", Specification="40V, 0.3A", Supplier=DigiKey
F1: library part "Fuse 2", "SMD Fuse", Manufacturer=LITTELFUSE, Manufacturer Part No.=1206SFH100F/24-2, Supplier part number=1832124, Link=https://uk.farnell.com/littelfuse/1206sfh100f-24-2/fuse-1206-10a/dp/1832124, Part Description="Fast Acting  Fuse", Specification=100A, Supplier=Farnell
FB1: "Ferrite Bead", Manufacturer_Name="Murata Electronics", Mouser Part Number=81-BLM18PG121SN1D, Arrow Part Number=BLM18PG121SN1D, Arrow Price/Stock=https://www.arrow.com/en/products/blm18pg121sn1d/murata-manufacturing.html?utm_currency=USD&region=europe, Datasheet Link=http://www.murata.com/~/media/webrenewal/support/library/catalog/products/emc/emifil/c31e.ashx?la=en-gb, Height=0.95mm, Manufacturer_Part_Number=BLM18PG121SN1D, Mouser Price/Stock=https://www.mouser.co.uk/ProductDetail/Murata-Electronics/BLM18PG121SN1D?qs=tY8e8KZalarVxhnmnUYZ1A%3D%3D
IC1: "Integrated Circuit", Manufacturer_Name=STMicroelectronics, Mouser Part Number=511-STM32F103RET6, Arrow Part Number=STM32F103RET6, Arrow Price/Stock=https://www.arrow.com/en/products/stm32f103ret6/stmicroelectronics.html?utm_currency=USD&region=nac, Datasheet Link=https://www.st.com/resource/en/datasheet/stm32f103rc.pdf, Height=1.6mm, Manufacturer_Part_Number=STM32F103RET6, Mouser Price/Stock=https://www.mouser.co.uk/ProductDetail/STMicroelectronics/STM32F103RET6?qs=tZXS5FmuAdnGL83bu1Xcew%3D%3D
IC2: library part LM74700-Q1MKX-1_NOPB, "Integrated Circuit", Manufacturer_Name="Texas Instruments", Manufacturer_Part_Number=LM74700-Q1MKX-1/NOPB, Datasheet Link=http://www.ti.com/lit/ds/symlink/lm74700-q1.pdf, Height=1.45mm
IC3: "Integrated Circuit", Manufacturer_Name="Diodes Incorporated", Mouser Part Number=621-AP2112K-1.2TRG1, Arrow Part Number=AP2112K-1.2TRG1, Arrow Price/Stock=https://www.arrow.com/en/products/ap2112k-1.2trg1/diodes-incorporated.html?utm_currency=USD&region=nac, Datasheet Link=https://www.diodes.com/assets/Datasheets/AP2112.pdf, Height=1.4mm, Manufacturer_Part_Number=AP2112K-1.2TRG1, Mouser Price/Stock=https://www.mouser.co.uk/ProductDetail/Diodes-Incorporated/AP2112K-1.2TRG1?qs=dZoB6MK9LKOx%252Blz%2FhgH2SA%3D%3D
IC6: "Integrated Circuit", Manufacturer_Name="Texas Instruments", Mouser Part Number=595-INA149AID, Arrow Part Number=INA149AID, Arrow Price/Stock=https://www.arrow.com/en/products/ina149aid/texas-instruments?utm_currency=USD&region=europe, Datasheet Link=http://www.ti.com/lit/ds/symlink/ina149.pdf, Height=1.75mm, Manufacturer_Part_Number=INA149AID, Mouser Price/Stock=https://www.mouser.co.uk/ProductDetail/Texas-Instruments/INA149AID?qs=Wh9GCymT6P2PNMu%252BdLSSCA%3D%3D
J1: "USB Connectors 24 Receptacle 1 8.94*7.3mm RoHS", Package=Package, Check_prices=https://www.snapeda.com/parts/TYPE-C-31-M-12/HRO+Electronics+Co.%252C+Ltd./view-part/?ref=eda, MF="HRO Electronics Co., Ltd.", MP=TYPE-C-31-M-12, SnapEDA_Link=https://www.snapeda.com/parts/TYPE-C-31-M-12/HRO+Electronics+Co.%252C+Ltd./view-part/?ref=snap
J2 J7 J8: library part B4B-XH-A(LF)(SN), "Connector Header Through Hole 4 position 0.098 (2.50mm)", Package=None, Check_prices=https://www.snapeda.com/parts/B4B-XH-A(LF)(SN)/JST+Sales+America+Inc./view-part/?ref=eda, MF="JST Sales", MP=B4B-XH-A(LF)(SN), SnapEDA_Link=https://www.snapeda.com/parts/B4B-XH-A(LF)(SN)/JST+Sales+America+Inc./view-part/?ref=snap
J3: library part 282815-3, "Connector", Manufacturer_Name="TE Connectivity", Mouser Part Number=571-282815-3, Arrow Part Number=282815-3, Arrow Price/Stock=https://www.arrow.com/en/products/282815-3/te-connectivity, Datasheet Link=https://www.te.com/commerce/DocumentDelivery/DDEController?Action=srchrtrv&DocNm=1-773958-1&DocType=Data%20Sheet&DocLang=English&PartCntxt=282815-3&DocFormat=pdf, Height=8.35mm, Manufacturer_Part_Number=282815-3, Mouser Price/Stock=https://www.mouser.co.uk/ProductDetail/TE-Connectivity/282815-3?qs=79%2FjLZ2kXkqd6grVMiPYfw%3D%3D
J4: library part 282815-2, "Connector", Manufacturer_Name="TE Connectivity", Mouser Part Number=571-282815-2, Arrow Part Number=282815-2, Arrow Price/Stock=https://www.arrow.com/en/products/282815-2/te-connectivity?region=nac, Datasheet Link=https://www.te.com/commerce/DocumentDelivery/DDEController?Action=srchrtrv&DocNm=1-773958-1&DocType=Data%20Sheet&DocLang=English&PartCntxt=282815-2&DocFormat=pdf, Height=8.5mm, Manufacturer_Part_Number=282815-2, Mouser Price/Stock=https://www.mouser.co.uk/ProductDetail/TE-Connectivity/282815-2?qs=79%2FjLZ2kXkpF7MFURi982A%3D%3D
J6 J9 J15: "Connector", Manufacturer_Name="TE Connectivity", Mouser Part Number=571-282815-2, Arrow Part Number=282815-2, Arrow Price/Stock=https://www.arrow.com/en/products/282815-2/te-connectivity?region=nac, Datasheet Link=https://www.te.com/commerce/DocumentDelivery/DDEController?Action=srchrtrv&DocNm=1-773958-1&DocType=Data%20Sheet&DocLang=English&PartCntxt=282815-2&DocFormat=pdf, Height=8.5mm, Manufacturer_Part_Number=282815-2, Mouser Price/Stock=https://www.mouser.co.uk/ProductDetail/TE-Connectivity/282815-2?qs=79%2FjLZ2kXkpF7MFURi982A%3D%3D
L1: "Inductor", Manufacturer_Name=Bourns, Mouser Part Number=652-SRP1038WA-6R8M, Datasheet Link=http://www.bourns.com/docs/Product-Datasheets/SRP1038WA.pdf, Height=4mm, Manufacturer_Part_Number=SRP1038WA-6R8M, Mouser Price/Stock=https://www.mouser.co.uk/ProductDetail/Bourns/SRP1038WA-6R8M?qs=Li%252BoUPsLEnvjAfZ1C4lLZQ%3D%3D
L2 L3: "Inductor", Manufacturer_Name="Yageo Group", Mouser Part Number=673-PA4302.103NLT, Arrow Part Number=PA4302.103NLT, Arrow Price/Stock=https://www.arrow.com/en/products/pa4302.103nlt/pulse-electronics-corporation?region=nac, Datasheet Link=https://www.mouser.com/datasheet/2/336/-559356.pdf, Height=5.6mm, Manufacturer_Part_Number=PA4302.103NLT, Mouser Price/Stock=https://www.mouser.co.uk/ProductDetail/Pulse-Electronics/PA4302.103NLT?qs=ZU1dyKYMvyPXoPwo6qMOJg%3D%3D
L4: "Inductor", Manufacturer_Name="Wurth Elektronik", Mouser Part Number=710-744231091, Datasheet Link=https://www.we-online.com/catalog/datasheet/744231091.pdf, Height=1.2mm, Manufacturer_Part_Number=744231091, Mouser Price/Stock=https://www.mouser.co.uk/ProductDetail/Wurth-Elektronik/744231091?qs=PGXP4M47uW7beLYOUbZm8Q%3D%3D
LS1: "Loudspeaker or Buzzer", Manufacturer_Name="Same Sky", Mouser Part Number=490-CMI-1295IC-0585T, Arrow Part Number=CMI-1295IC-0585T, Arrow Price/Stock=https://www.arrow.com/en/products/cmi-1295ic-0585t/cui-devices?utm_currency=USD&region=nac, Datasheet Link=https://www.sameskydevices.com/product/resource/CMI-1295IC-0585T.pdf, Height=9.7mm, Manufacturer_Part_Number=CMI-1295IC-0585T, Mouser Price/Stock=https://www.mouser.co.uk/ProductDetail/Same-Sky/CMI-1295IC-0585T?qs=OlC7AqGiEDkuskN%2Fok3iNw%3D%3D
PS1 PS2: "Power Supply", Manufacturer_Name="Texas Instruments", Mouser Part Number=595-TPS54202DDCR, Arrow Part Number=TPS54202DDCR, Arrow Price/Stock=https://www.arrow.com/en/products/tps54202ddcr/texas-instruments?utm_currency=USD&region=nac, Datasheet Link=http://www.ti.com/lit/gpn/tps54202, Height=1.1mm, Manufacturer_Part_Number=TPS54202DDCR, Mouser Price/Stock=https://www.mouser.co.uk/ProductDetail/Texas-Instruments/TPS54202DDCR?qs=uP22XH7NdCsJtN%2Fq54jCtQ%3D%3D
Q1: "Integrated Circuit", Manufacturer_Name="Lattice Semiconductor", Mouser Part Number=N/A, Datasheet Link=https://media.digikey.com/pdf/Data%20Sheets/Diodes%20PDFs/DMG3415U.pdf, Height=1.1mm, Manufacturer_Part_Number=DMG3415U-7, Mouser Price/Stock=https://www.mouser.com/Search/Refine.aspx?Keyword=N%2FA
Q2: "MOSFET (N-Channel)", Manufacturer_Name=Infineon, Mouser Part Number=726-BSC014N06NSATMA1, Arrow Part Number=BSC014N06NSATMA1, Arrow Price/Stock=https://www.arrow.com/en/products/bsc014n06nsatma1/infineon-technologies-ag?region=nac, Datasheet Link=http://www.farnell.com/datasheets/1849651.html, Height=1.1mm, Manufacturer_Part_Number=BSC014N06NSATMA1, Mouser Price/Stock=https://www.mouser.co.uk/ProductDetail/Infineon-Technologies/BSC014N06NSATMA1?qs=K00xGehIljshgUA78G26tg%3D%3D
Q3 Q5: "Power MOSFET N-channel", Manufacturer=STMicroelectronics, Supplier part number=1752112RL, Link=https://uk.farnell.com/stmicroelectronics/stl150n3llh5/mosfet-n-ch-30v-35a-powerflat6x5/dp/1752112RL, Manufacturer Part No.=STL150N3LLH5, Part Description="P-channel Power MOSFET", Specification="30V, 35A", Supplier=Farnell
Q4: library part NMOS-2, "N-Channel Power MOSFET", Manufacturer="Diodes Incorporated", Manufacturer Part No.=DMG1012T-7, Supplier part number=DMG1012T-7DICT-ND, Link=https://www.digikey.com/product-detail/en/diodes-incorporated/DMG1012T-7/DMG1012T-7DICT-ND/2181232, Part Description="N-Channel MOSFET", Specification="20V, 0.63A", Supplier=DigiKey
R1 R2 R13 R15: "Resistor", Manufacturer_Name=Vishay, Mouser Part Number=71-CRCW0402100KFKEDH, Arrow Part Number=CRCW0402100KFKEDHP, Arrow Price/Stock=https://www.arrow.com/en/products/crcw0402100kfkedhp/vishay?utm_currency=USD&region=nac, Datasheet Link=http://www.vishay.com/docs/20035/dcrcwe3.pdf, Height=0.4mm, Manufacturer_Part_Number=CRCW0402100KFKEDHP, Mouser Price/Stock=https://www.mouser.co.uk/ProductDetail/Vishay-Dale/CRCW0402100KFKEDHP?qs=k2%2FDWSARqgGFakjlJe4Ejw%3D%3D
R3 R4 R5 R6 R7 R8 R9 R11 R12 R19 R20 R34 R35 R36 R40 R41 R42 R43 R62 R63 R64 R65: library part RES, "Resistor", Manufacturer_Name="UNI-ROYAL(Uniroyal Elec)", Manufacturer_Part_Number=0603WAF1001T5E, Datasheet Link=https://datasheet.lcsc.com/szlcsc/Uniroyal-Elec-0603WAF1001T5E_C21190.pdf, Height=0.55mm
R14: "Resistor", Manufacturer_Name=Vishay, Mouser Part Number=71-CRCW040216K9FKEDH, Datasheet Link=http://www.vishay.com/docs/20035/dcrcwe3.pdf, Height=0.4mm, Manufacturer_Part_Number=CRCW040216K9FKEDHP, Mouser Price/Stock=https://www.mouser.com/Search/Refine.aspx?Keyword=71-CRCW040216K9FKEDH
R16: "Resistor", Manufacturer_Name=Vishay, Mouser Part Number=N/A, Arrow Part Number=CRCW040213K7FKEDHP, Arrow Price/Stock=https://www.arrow.com/en/products/crcw040213k7fkedhp/vishay?region=nac, Datasheet Link=http://www.vishay.com/docs/20035/dcrcwe3.pdf, Height=0.4mm, Manufacturer_Part_Number=CRCW040213K7FKEDHP, Mouser Price/Stock=https://www.mouser.co.uk/ProductDetail/Vishay-Dale/CRCW040213K7FKEDHP?qs=VAB4DzKv5wWcbGmoe9QIoA%3D%3D
R44 R45 R50 R51 R53 R54 R58 R59 R61: library part Res2, Manufacturer=Yageo, Manufacturer Part No.=RC0402JR-07100KL, Supplier part number=311-100KJRCT-ND, Link=https://www.digikey.com/product-detail/en/yageo/RC0402JR-07100KL/311-100KJRCT-ND/729363, Part Description="Thick Film Resistor", Specification="5% 0,063W", Supplier=DigiKey
R46 R47: library part Res2, Manufacturer=Yageo, Manufacturer Part No.=AC0402JR-071KL, Supplier part number=YAG3525CT-ND, Link=https://www.digikey.com/product-detail/en/yageo/AC0402JR-071KL/YAG3525CT-ND/6006374, Part Description="Thick Film Resistor", Specification="5% 0,063W", Supplier=DigiKey
R48: library part Res2, Manufacturer=Yageo, Manufacturer Part No.=RC0402JR-0712KL, Supplier part number=311-12KJRCT-ND, Link=https://www.digikey.com/product-detail/en/yageo/RC0402JR-0712KL/311-12KJRCT-ND/729370, Part Description="Thick Film Resistor", Specification="5% 0,063W", Supplier=DigiKey
R49: library part Res2, Manufacturer=Yageo, Manufacturer Part No.=RC0402FR-0724K9L, Supplier part number=311-24.9KLRCT-ND, Link=https://www.digikey.com/product-detail/en/yageo/RC0402FR-0724K9L/311-24-9KLRCT-ND/729514, Part Description="Thick Film Resistor", Specification="1% 0,063W", Supplier=DigiKey
R52: library part Res2, Manufacturer=Yageo, Manufacturer Part No.=RC0402JR-07150KL, Supplier part number=311-150KJRCT-ND, Link=https://www.digikey.com/product-detail/en/yageo/RC0402JR-07150KL/311-150KJRCT-ND/729372, Part Description="Thick Film Resistor", Specification="5% 0,063W", Supplier=DigiKey
R55: library part Res2, Manufacturer=Yageo, Manufacturer Part No.=RC0402JR-07560KL, Supplier part number=311-560KJRCT-ND, Link=https://www.digikey.com/product-detail/en/yageo/RC0402JR-07560KL/311-560KJRCT-ND/729440, Part Description="Thick Film Resistor", Specification="5% 0,063W", Supplier=DigiKey
R56: library part Res2, Manufacturer=Yageo, Manufacturer Part No.=RC0402JR-0711KL, Supplier part number=311-11KJRCT-ND, Link=https://www.digikey.com/product-detail/en/yageo/RC0402JR-0711KL/311-11KJRCT-ND/729367, Part Description="Thick Film Resistor", Specification="5% 0,063W", Supplier=DigiKey
R57: library part Res2, Manufacturer=Yageo, Manufacturer Part No.=RC0100JR-0710KL, Supplier part number=311-10KDHCT-ND, Link=https://www.digikey.com/product-detail/en/yageo/RC0100JR-0710KL/311-10KDHCT-ND/2254412, Part Description="Thick Film Resistor", Specification="5% 0.03W", Supplier=DigiKey
R60: library part Res2, Manufacturer=Yageo, Manufacturer Part No.=RC0402JR-07110KL, Supplier part number=311-110KJRCT-ND, Link=https://www.digikey.com/product-detail/en/yageo/RC0402JR-07110KL/311-110KJRCT-ND/729366, Part Description="Thick Film Resistor", Specification="5% 0,063W", Supplier=DigiKey
S1 S2: "Tactile Switch SPST-NO Top Actuated Surface Mount", Package=None, Availability="In Stock", Check_prices=https://www.snapeda.com/parts/PTS526%20SMG15%20SMTR2%20LFS/C%2526K/view-part/?ref=eda, MF=C&K, MP="PTS526 SMG15 SMTR2 LFS", Price=None, Purchase-URL="https://pricing.snapeda.com/search/part/PTS526 SMG15 SMTR2 LFS/?ref=eda", SnapEDA_Link=https://www.snapeda.com/parts/PTS526%20SMG15%20SMTR2%20LFS/C%2526K/view-part/?ref=snap
TP1: "Test Point"
U1: "USB to serial chip CH340", Package=None, Availability="Not in stock", Check_prices=https://www.snapeda.com/parts/CH340C/WCH/view-part/?ref=eda, MF=WCH, MP=CH340C, Price=None, SnapEDA_Link=https://www.snapeda.com/parts/CH340C/WCH/view-part/?ref=snap
U3: "Maximum Power Point Charger", Manufacturer=TI, Manufacturer Part No.=BQ24650RVAR, Supplier part number=296-46287-1-ND, Link=https://www.digikey.com/product-detail/en/texas-instruments/BQ24650RVAR/296-46287-1-ND/7033462, Part Description="Battery Charge Controller", Specification="28V, MPPT", Supplier=DigiKey
Y1: "Tuning Fork Crystal 32.768kHz in SMD 1.2 x 2.0mm package", Package="SMD-2 Micro Crystal", Check_prices=https://www.snapeda.com/parts/CM8V-T1A-32.768kHz-6pF-20PPM-TA-QC/Micro+Crystal/view-part/?ref=eda, MF="Micro Crystal", MP=CM8V-T1A-32.768kHz-6pF-20PPM-TA-QC, SnapEDA_Link=https://www.snapeda.com/parts/CM8V-T1A-32.768kHz-6pF-20PPM-TA-QC/Micro+Crystal/view-part/?ref=snap
Y2: Package=None, Availability=Unavailable, MP=C3E-25.000-8-1530-X-R, Price=None

## Via types
v1: diameter 0.6, hole 0.3, Top Layer to Bottom Layer, 168 vias
v2: diameter 0.6, hole 0.3, Top Layer to Bottom Layer, tented both sides, 49 vias
v3: diameter 0.508, hole 0.254, Top Layer to Bottom Layer, tented both sides, 4 vias
v4: diameter 5, hole 3, Top Layer to Bottom Layer, 4 vias
v5: diameter 1.6, hole 0.8, Top Layer to Bottom Layer, tented both sides, 2 vias

## Nets (pads, with @x,y where several pads share a name; then routed paths per layer and width w, separated by ;. In a path a pad name is that pad's centre, name@x,y a point inside that pad or via, vN(x,y) a via of type N, cw(c..) or ccw(c..) an arc to the next point about the centre after c; other vN are vias at no path point)
+3.3: C3.1 C12.1 C24.1 C25.1 C26.1 C27.1 C28.1 IC1.13 IC1.19 IC1.32 IC1.48 IC1.64 IC3.5 J2.3 J3.3 J8.4 R3.2 R4.2 R5.2 R6.2 R7.2 R9.2 R34.2 R42.2 | length 270.6
  Top Layer w0.127: R5.2@54.699,116.84 54.312,117.227 54.312,125.051 54.737,125.476 60.198,125.476 60.91,124.764 60.91,124.089 J2.3@61.174,123.825 61.174,121.833 62.143,120.864 62.143,116.967 ; R6.2@60.617,116.967 62.143,116.967 ; C28.1@77.851,78.267 79.262,78.267 81.041,80.046 IC1.13@84.686,80.046 87.793,80.046 89.662,81.915 v2(90.551,81.915) ; R7.2@83.096,38.862 83.096,33.059 J3.3@86.106,30.049 ; C3.1@85.979,54.331 89.129,54.331 89.827,55.029 R42.2@91.567,55.029 91.567,60.96 94.145,63.538 R34.2@95.504,63.538 ; v2(85.979,72.263) 87.674,73.958 IC1.19@87.674,76.558 ; C24.1@86.649,92.583 86.674,92.558 IC1.64@86.674,88.034 86.674,85.792 v2(90.551,81.915) ; C25.1@94.326,73.406 94.174,73.558 IC1.32@94.174,76.558 94.174,79.943 92.202,81.915 v2(90.551,81.915) ; R9.2@101.6,82.842 101.6,84.858 100.404,86.053 100.397,86.046 IC1.48@96.162,86.046 92.777,86.046 90.551,83.82 v2(90.551,81.915) ; J8.4@103.124,123.825 103.124,121.74 102.669,121.285 98.679,121.285 86.106,108.712 78.031,108.712 73.939,112.804 R4.2@73.914,112.804 73.889,112.804 72.647,114.046 65.405,114.046 64.3,112.941 R3.2@62.484,112.941 62.484,116.626 62.143,116.967
  Top Layer w0.508: R7.2@83.096,38.862 83.096,42.507 81.061,44.542 C12.1@81.061,52.421 81.061,52.486 81.341,52.766 IC3.5@81.341,54.55 84.667,54.55 C3.1@84.861,54.356 ; C3.1@85.979,54.331 v2(85.979,72.263)
  Bottom Layer w0.508: J2.3@61.174,123.825 85.979,99.02 85.979,81.915 ; v2(85.979,72.263) 85.979,81.915 ; v2(90.551,81.915) 85.979,81.915
+3.3V: R59.1 R61.1 | length 1.7
  Top Layer w0.127: R61.1@33.561,80.264 R59.1@33.561,81.915
+4.1V: C18.2 C19.2 J7.4 L2.2 R13.2 | length 11.7
  Top Layer w1.016: 46.863,112.522 46.863,115.951 47.819,116.907 J7.4@47.819,123.825
+5: C11.1 C22.2 C23.2 IC3.1 IC3.3 L3.2 Q1.3 R15.2 R64.2 R65.2 | length 111.5
  Top Layer w0.508: C23.2@73.025,56.328 76.013,56.328 76.586,56.901 C11.1@77.597,56.901 ; v2(77.597,60.071) C11.1@77.597,56.901 ; IC3.3@79.441,57.15 IC3.3@79.441,56.947 ; IC3.1@81.341,57.15 81.295,57.104 81.295,56.276 80.899,55.88 79.739,55.88 79.441,56.178 IC3.3@79.441,56.947 ; v2(93.726,57.15) 93.726,57.125 93.853,56.998 R65.2@93.853,55.067 ; v2(93.853,109.728) 93.878,109.728 93.949,109.799 Q1.3@96.605,109.799 ; R64.2@98.171,63.538 v2(98.171,65.786) ; C11.1@77.597,56.901 79.395,56.901 IC3.3@79.441,56.947
  Bottom Layer w0.508: v2(77.597,60.071) 93.726,60.071 ; v2(93.726,57.15) 93.726,60.071 ; v2(93.853,109.728) 101.473,109.728 104.648,106.553 104.648,66.167 103.251,64.77 ; v2(98.171,65.786) 99.187,64.77 103.251,64.77 ; 93.726,60.071 98.552,60.071 103.251,64.77
+VIN: C8.1 C9.2 C10.1 C41.2 C42.2 C46.2 IC2.4 Q2.5 Q2.6 Q2.7 Q2.8 Q2.9 Q3.5 Q3.6 Q3.7 Q3.8 R12.1 R44.2 R50.2 R51.1 R52.2 | length 15.9
  Top Layer w0.127: R12.1@30.607,43.726 30.607,44.323 31.242,44.958 33.909,44.958 ; R52.2@34.29,88.798 34.29,89.756 R50.2@34.13,89.916 34.13,91.28 34.417,91.567 37.051,91.567 R51.1@37.211,91.407 37.211,92.456 39.243,94.488 39.243,96.52
ADC_1: IC1.22
ADC_2: IC1.23
ADC_HC: IC1.25
ADC_HV: IC1.26